# Altium PCB DL-14542-V01 20261004.PcbDoc
Units mm, origin at the board's own origin, x right, y up, seen from the top; angles counter-clockwise.
Board outline 144.6 x 41.83 mm, 2 copper layers (TopLayer, BottomLayer); 111 components, 38 nets, 286 pads, 151 vias.
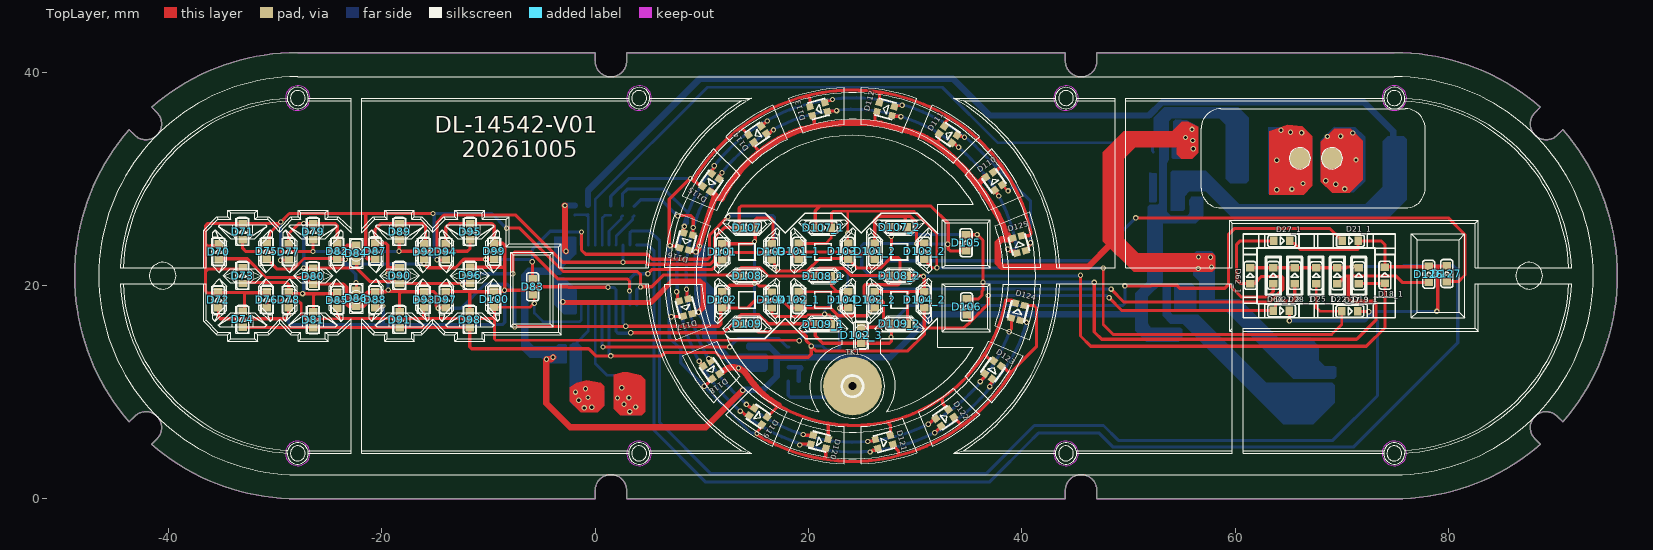
[diagram p0: TopLayer view]
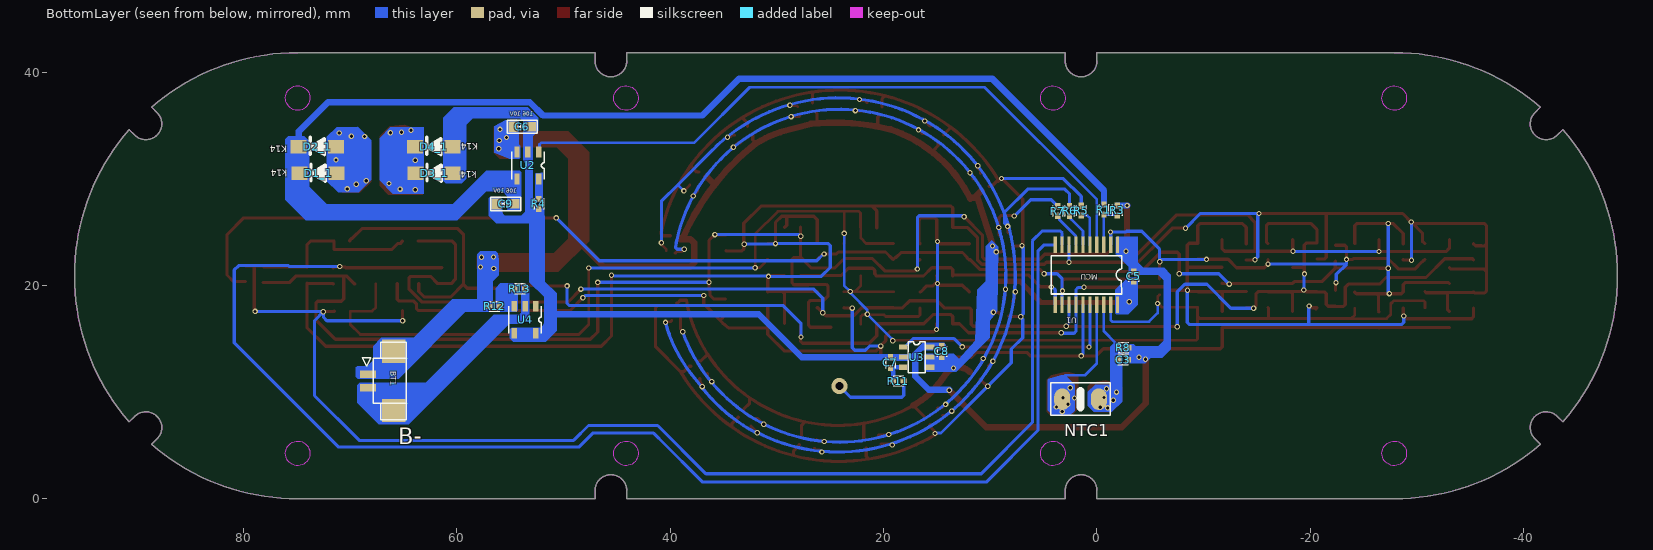
[diagram p1: BottomLayer view, seen from below]

## Layer stack, top to bottom
TopSolder: solder mask 0.0102, Solder Resist, Dk 3.5
TopLayer: signal copper 0.0356
Dielectric1: dielectric 0.32, FR-4, Dk 4.8
BottomLayer: signal copper 0.0356
BottomSolder: solder mask 0.0102, Solder Resist, Dk 3.5

## Board outline
-41.57,5.115 ccw(c-27.866,20.916) -27.866,0 0,0 0,0.791 cw(c1.482,0.791) 1.338,2.266 1.626,2.266 cw(c1.482,0.791) 2.964,0.791 2.964,0 44.071,0 44.071,0.791 cw(c45.553,0.791) 45.409,2.266 45.698,2.266 cw(c45.553,0.791) 47.036,0.791 47.036,0 74.901,0 ccw(c74.901,20.916) 88.606,5.115 88.084,5.637 cw(c89.132,6.685) 87.977,7.614 88.203,7.84 cw(c89.132,6.685) 90.18,7.733 90.702,7.211 ccw(c74.901,20.916) 90.702,34.62 90.18,34.098 cw(c89.132,35.146) 89.132,33.664 cw(c89.132,35.146) 88.203,33.991 87.986,34.206 87.977,34.217 cw(c89.132,35.146) 88.084,36.194 88.606,36.716 ccw(c74.901,20.916) 74.901,41.831 47.036,41.831 47.036,41.041 cw(c45.553,41.041) 45.698,39.566 45.553,39.559 45.409,39.566 cw(c45.553,41.041) 44.071,41.041 44.071,41.831 2.964,41.831 2.964,41.041 cw(c1.482,41.041) 1.626,39.566 1.482,39.559 1.338,39.566 cw(c1.482,41.041) 0,41.041 0,41.831 -27.866,41.831 ccw(c-27.866,20.916) -41.57,36.716 -41.048,36.194 cw(c-42.096,35.146) -40.955,34.201 -41.151,34.005 cw(c-42.096,35.146) -42.096,33.664 cw(c-42.096,35.146) -43.144,34.098 -43.666,34.62 ccw(c-27.866,20.916) -43.666,7.211 -43.144,7.733 cw(c-42.096,6.685) -41.151,7.827 -40.955,7.63 cw(c-42.096,6.685) -41.048,5.637

## Design rules (kind name [scope] priority, off if disabled: settings)
Clearance Clearance_1 [(InPoly)] p1: gap=0.254 ignorepadtopadclearanceinfootprint=FALSE except(0: Arc-Hole Track-Hole SMDPad-Hole THPad-Hole Via-Hole Fill-Hole Poly-Hole Region-Hole Text-Hole)
Clearance [All] p2: gap=0.178 ignorepadtopadclearanceinfootprint=FALSE except(0: Arc-Hole Track-Hole SMDPad-Hole THPad-Hole Via-Hole Fill-Hole Poly-Hole Region-Hole Text-Hole)
FabricationTestPointUsage TestPointUsage [All] p1: valid=0 allowmultiple=FALSE
FabricationTestpoint Testpoint [All] p1: side=3 testpointundercomponent=TRUE minsize=1.016 maxsize=2.54 preferedsize=1.524 minholesize=0.508 maxholesize=1.016 preferedholesize=0.813 testpointgrid=0.025 allowsidetop=TRUE allowsidebottom=TRUE usegrid=TRUE gridtolerance=0
PolygonConnect [All] p1: connectstyle=Relief reliefconductorwidth=0.254 reliefentries=4 polygonreliefangle="90 Angle" airgapwidth=0.254
RoutingVias [All] p1: holewidth=0.711 width=1.27 viastyle="Through Hole" minholewidth=0.711 minwidth=1.27 maxholewidth=0.711 maxwidth=1.27
SolderMaskExpansion [All] p1: expansion=0.102 istentingtop=FALSE
Width [All] p1: maxlimit=2.54 minlimit=0.152 preferedwidth=0.508
28 further rules are at their usual default settings.

## Components (designator, comment, footprint, x,y, rotation, side; value= is the part's Value field where it differs from the comment)
BT1 "1.25MM/2P卧贴" 1.25立贴2P 67.813,11.059 r270 bottom locked
C3 "10NF" SMD0402#1 -2.457,13.03 r180 bottom
C5 "100NF" SMD0402#1 -3.46,20.859 r90 bottom
C6 "106 10V" 0603CX 53.012,34.874 r180 bottom
C7 "15PF" SMD0402#2 19.355,12.268 r90 bottom
C8 "100NF" SMD0402#2 14.529,14.326 r270 bottom
C9 "106 10V" 0603CX 54.568,27.644 r180 bottom
D1_1 "k14" SOD123A 73.002,30.523 r0 bottom locked
D2_1 "K14" SOD123A 73.078,33.012 r0 bottom locked
D3_1 "k14" SOD123A 62.13,30.523 r0 bottom locked
D4_1 "K14" SOD123A 62.156,33.012 r0 bottom locked
D18_1 "3A" LED-1 74.029,20.955 r90 top locked
D19_1 "3A" LED-1 71.565,20.904 r90 top locked
D21_1 "3B" LED-1 70.778,24.18 r0 top locked
D22_1 "3B" LED-1 69.558,20.904 r90 top locked
D25_1 "3C" LED-1 67.577,20.904 r90 top locked
D27_1 "3D" LED-1 64.351,24.18 r0 top locked
D27_2 "3D" LED-1 64.33,17.644 r0 top locked
D27_3 "3D" LED-1 70.73,17.593 r0 top locked
D28_1 "3D" LED-1 65.571,20.929 r90 top locked
D60_1 "3E" LED-1 63.564,20.929 r90 top locked
D62_1 "3F" LED-1 61.405,20.929 r90 top locked
D70 "1E" LED-1 -35.286,23.171 r90 top locked
D71 "1E" LED-1 -33.034,25.052 r90 top locked
D72 "1E" LED-1 -35.295,18.651 r90 top locked
D73 "1E" LED-1 -33.034,20.937 r90 top locked
D74 "1E" LED-1 -33.026,16.821 r90 top locked
D75 "1E" LED-1 -30.748,23.198 r90 top locked
D76 "1E" LED-1 -30.748,18.677 r90 top locked
D77 "1E" LED-1 -28.716,23.173 r90 top locked
D78 "1E" LED-1 -28.716,18.651 r90 top locked
D79 "1E" LED-1 -26.43,25.052 r90 top locked
D80 "1E" LED-1 -26.43,20.887 r90 top locked
D81 "1E" LED-1 -26.43,16.797 r90 top locked
D82 "1E" LED-1 -24.17,23.198 r90 top locked
D83 "1E" LED-1 -5.856,19.871 r90 top locked
D84 "1E" LED-1 -22.366,23.02 r90 top locked
D85 "1E" LED-1 -24.17,18.626 r90 top locked
D86 "1E" LED-1 -22.366,18.804 r90 top locked
D87 "1E" LED-1 -20.614,23.223 r90 top locked
D88 "1E" LED-1 -20.614,18.651 r90 top locked
D89 "1E" LED-1 -18.328,25.052 r90 top locked
D90 "1E" LED-1 -18.328,20.937 r90 top locked
D91 "1E" LED-1 -18.315,16.804 r90 top locked
D92 "1E" LED-1 -16.029,23.179 r90 top locked
D93 "1E" LED-1 -16.029,18.683 r90 top locked
D94 "1E" LED-1 -13.997,23.154 r90 top locked
D95 "1E" LED-1 -11.715,25.05 r90 top locked
D96 "1E" LED-1 -11.715,20.961 r90 top locked
D97 "1E" LED-1 -13.997,18.683 r90 top locked
D98 "1E" LED-1 -11.737,16.804 r90 top locked
D99 "1E" LED-1 -9.451,23.205 r90 top locked
D100 "1E" LED-1 -9.429,18.7 r90 top locked
D101 "1E" LED-1 11.932,23.17 r90 top locked
D101_1 "1E" LED-1 19.07,23.196 r90 top locked
D101_2 "1E" LED-1 26.207,23.196 r90 top locked
D102 "1E" LED-1 11.932,18.649 r90 top locked
D102_1 "1E" LED-1 19.07,18.675 r90 top locked
D102_2 "1E" LED-1 26.207,18.675 r90 top locked
D102_3 "1E" LED-1 24.935,15.342 r90 top locked
D103 "1E" LED-1 16.578,23.163 r90 top locked
D103_1 "1E" LED-1 23.716,23.189 r90 top locked
D103_2 "1E" LED-1 30.853,23.189 r90 top locked
D104 "1E" LED-1 16.578,18.642 r90 top locked
D104_1 "1E" LED-1 23.716,18.668 r90 top locked
D104_2 "1E" LED-1 30.853,18.668 r90 top locked
D105 "1E" LED-1 34.765,24.002 r90 top locked
D106 "1E" LED-1 34.818,17.989 r90 top locked
D107 "1E" LED-1 14.269,25.428 r0 top locked
D107_1 "1E" LED-1 21.381,25.402 r0 top locked
D107_2 "1E" LED-1 28.519,25.453 r0 top locked
D108 "1E" LED-1 14.269,20.91 r0 top locked
D108_1 "1E" LED-1 21.381,20.884 r0 top locked
D108_2 "1E" LED-1 28.519,20.935 r0 top locked
D109 "1E" LED-1 14.269,16.411 r0 top locked
D109_1 "1E" LED-1 21.381,16.385 r0 top locked
D109_2 "1E" LED-1 28.519,16.436 r0 top locked
D110 "1615RGB" 1615RGB 37.39,29.788 r305 top locked
D111 "1615RGB" 1615RGB 33.091,34.143 r325 top locked
D112 "1615RGB" 1615RGB 27.238,36.534 r345 top locked
D113 "1615RGB" 1615RGB 20.955,36.533 r15 top locked
D114 "1615RGB" 1615RGB 15.221,34.176 r35 top locked
D115 "1615RGB" 1615RGB 10.853,29.65 r55 top locked
D116 "1615RGB" 1615RGB 8.525,24.125 r75 top locked
D117 "1615RGB" 1615RGB 8.501,17.944 r105 top locked
D118 "1615RGB" 1615RGB 10.909,12.082 r125 top locked
D119 "1615RGB" 1615RGB 15.283,7.74 r145 top locked
D120 "1615RGB" 1615RGB 21.036,5.362 r165 top locked
D121 "1615RGB" 1615RGB 27.091,5.337 r195 top locked
D122 "1615RGB" 1615RGB 32.774,7.593 r215 top locked
D123 "1615RGB" 1615RGB 37.294,12.094 r235 top locked
D124 "1615RGB" 1615RGB 39.622,17.543 r255 top locked
D125 "1615RGB" 1615RGB 39.748,23.851 r285 top locked
D126 "1E" LED-1 78.131,21.042 r90 top locked
D127 "1E" LED-1 79.827,21.113 r90 top locked
NTC1 "100K" "2P PAD-T" 0.127,9.347 r0 bottom
R1 "1K" SMD0402#1 -0.66,27.102 r270 bottom
R3 "2K" SMD0402#1 -1.905,27.051 r270 bottom
R4 "4K7" SMD0402#1 52.299,27.661 r90 bottom
R5 "22R" SMD0402#1 1.473,27.026 r270 bottom
R6 "22R" SMD0402#1 2.565,27 r270 bottom
R7 "22R" SMD0402#1 3.658,26.975 r270 bottom
R8 "100K" SMD0402#1 -2.483,14.173 r180 bottom
R11 "1K" SMD0402#2 18.101,11.049 r0 bottom
R12 "1K" SMD0402#3 56.946,18.027 r180 bottom
R13 "104P" SMD0402#3 53.595,19.717 r0 bottom
TK1 "CHUMO" PAD1 24.124,10.572 r0 top locked
U1 "MCU" TSSOP-20 -1.936,23.806 r0 bottom locked
U2 "TP4054" SOT23-5B 52.318,32.518 r270 bottom
U3 "PT2041" SOT-23-6A 18.154,14.244 r90 bottom
U4 "RY2201" SOT23-5B 52.578,18.059 r270 bottom locked

## Footprints (in the part's own frame and the unit in brackets; to place one, negate y for a bottom-side part, rotate by r counter-clockwise, add the part's x,y. Pads: shape width x height; smd on the part's side, far side on the other; paste and mask are expansions set on the pad)
1.25立贴2P [mm]
  rect 2.2x2.2 smd: 0(-2.8,1.906) 0(2.773,1.906)
  rect 0.7x1.524 smd: 1(-0.618,-0.5) 2(0.632,-0.5)
  silkscreen extent -3.62,-1.05 3.63,3.1
"2P PAD-T" [mil]
  oval 59.06x80 smd: 1(-12,0) 2(123,0)
  silkscreen extent -55,-60 165,60
0603CX [mm]
  rect 0.9x0.9 smd: 1(0,0)
  rect 0.9x1 smd: 2(-1.7,0)
  silkscreen extent -2.25,-0.63 0.55,0.62
1615RGB [mm]
  rect 0.65x0.65 smd: 1(-0.725,0.43) 2(0.725,0.43) 3(0.725,-0.43) 4(-0.725,-0.43)
  silkscreen extent -0.81,-0.8 0.79,0.8
LED-1 [mm]
  rect 0.7x0.8 smd: 1(-0.75,0) 2(0.75,0)
  silkscreen extent -1.3,-0.56 1.32,0.56
PAD1 [mm]
  round 5.5 smd: 1(0.01,0)
  silkscreen extent -1,-1 1,1
SMD0402#1 [mm]
  rect 0.6x0.5 smd: 1(-0.45,0) 2(0.45,0)
  silkscreen extent -0.5,-0.46 0.5,0.46
SMD0402#2 [mm]
  rect 0.6x0.5 smd: 1(0,0) 2(1,0)
  silkscreen extent 0,-0.46 1,0.46
SMD0402#3 [mm]
  rect 0.6x0.5 smd: 1(-0.011,0.007) 2(0.99,0.007)
  silkscreen extent -0.01,-0.45 0.99,0.47
SOD123A [mm]
  rect 1.5x1.25 smd: 1(-1.75,0) 2(1.75,0)
  silkscreen extent -0.67,-0.87 0.65,0.75
SOT23-5B [mil]
  rect 40x20 smd: 1(0,0) 2(0,-40) 3(0,-80) 4(100,-80) 5(100,0)
  silkscreen extent 0,-100 100,20
SOT-23-6A [mm]
  rect 0.5x0.8 smd: 1(0,0) 2(-0.95,0) 3(-1.9,0) 4(-1.9,-2.507) 5(-0.95,-2.507) 6(0,-2.507)
  silkscreen extent -2.4,-2.05 0.5,-0.45
TSSOP-20 [mm]
  rect 0.3x1.55 smd: 1(0,0) 2(0.65,0) 3(1.3,0) 4(1.95,0) 5(2.6,0) 6(3.25,0) 7(3.9,0) 8(4.55,0) 9(5.2,0) 10(5.85,0) 11(5.85,5.6) 12(5.2,5.6) 13(4.55,5.6) 14(3.9,5.6) 15(3.25,5.6) 16(2.6,5.6) 17(1.95,5.6) 18(1.3,5.6) 19(0.65,5.6) 20(0,5.6)
  silkscreen extent -0.37,1 6.23,4.6

## Free pads (board coordinates)
  round 1.524 hole 0.762: 3(24.134,10.572)
  round 2 smd: 8(66.051,31.916) 8(69.051,31.916)

## Via types
v1: diameter 0.5, hole 0.3, TopLayer to BottomLayer, 151 vias

## Nets (pads, with @x,y where several pads share a name; then routed paths per layer and width w, separated by ;. In a path a pad name is that pad's centre, name@x,y a point inside that pad or via, vN(x,y) a via of type N, cw(c..) or ccw(c..) an arc to the next point about the centre after c; other vN are vias at no path point)
5V: C9.1 D1_1.2 D2_1.2 R1.1 U2.4 | length 114.8
  BottomLayer w0.6: R1.1 -0.66,28.905 9.83,39.395 33.528,39.395 36.992,35.932 51.918,35.932 53.167,37.181 72.065,37.181 74.79,34.456 74.79,33.012 74.79,30.561 D1_1.2 74.752,28.727 73.05,27.026 60.046,27.026 57.093,29.978 54.396,29.978 54.396,29.921 U2.4@54.35,29.967 ; U2.4 U2.4@54.35,29.967 ; C9.1 54.418,27.794 54.418,28.109 54.381,28.145 54.381,29.421 54.35,29.452 U2.4@54.35,29.967
B5: R12.2 R13.2 U4.3 | length 3
  BottomLayer w0.4: R13.2 54.597,19.698 54.597,18.072 U4.3 54.623,18.047 55.944,18.047 R12.2
B+: BT1.0@65.907,13.859 BT1.1 C5.1 C6.2 C8.2 D110.4 D111.4 D112.4 D113.4 D114.4 D115.4 D116.4 D117.4 D118.4 D119.4 D120.4 D121.4 D122.4 D123.4 D124.4 D125.4 R12.1 U1.20 U2.3 U3.4 U3.5 | length 190.4
  TopLayer w0.3: D116.4 8.825,23.241 9.009,23.154 v1(9.433,23.154) ; D117.4 9.211,17.462 9.665,17.462 v1(9.703,17.501) ; D115.4 11.243,28.356 11.282,28.317 11.283,28.316 11.361,28.238 ; D118.4 11.825,11.829 11.922,11.897 ccw(c11.712,12.111) D118.4@11.925,11.9 ; D114.4 14.873,33.123 15.313,32.683 15.313,32.403 ; D119.4 17.202,8.755 ccw(c24.207,21.02) 21.848,7.094 ; 19.481,34.716 cw(c24.605,19.758) 20.641,35.065 20.534,35.172 20.534,35.763 D113.4 ; D120.4 21.848,7.094 ; 26.347,35.257 26.241,35.365 26.241,36.121 D112.4 ; 26.365,35.238 26.368,35.234 ; D121.4 27.68,6.9 27.357,7.222 ; 31.939,33.329 32.25,33.64 D111.4 ; D122.4 33.121,8.385 32.549,8.957 32.549,9.48 ; D123.4 37.107,12.934 36.484,13.557 ; D124.4 39.314,18.354 39.05,18.618 38.479,18.618 cw(c24.734,21.111) 36.484,13.557 ; 21.848,7.094 ccw(c24.273,21.408) 27.357,7.222 ; 27.357,7.222 ccw(c24.273,21.408) 32.549,9.48 ; 32.549,9.48 ccw(c24.273,21.408) 36.484,13.557
  TopLayer w0.4: v1(55.337,33.872) 49.824,33.872 48.793,32.842 48.793,23.825 49.948,22.671 v1(56.557,22.671)
  TopLayer w0.5: v1@-3.085,18.415 5.232,18.415 7.214,20.396 9.842,20.396 10.135,20.103 10.135,17.932 v1(9.703,17.501)
  TopLayer w0.6: v1@9.514,23.221 9.616,23.323 9.66,23.461 ; v1@9.745,23.721 11.204,28.238 11.361,28.238 ; D115.4 10.898,28.809 11.47,28.238 11.774,28.238 11.88,28.132 cw(c23.115,22.665) 15.227,32.355 ; D118.4@11.925,11.9 cw(c12.969,10.856) 14.222,11.636 ccw(c21.667,16.304) 15.453,10.091 ccw(c21.307,15.943) 17.202,8.755 ; 15.313,32.403 cw(c23.575,22.253) 19.333,34.634 ; 19.252,34.589 cw(c24.583,14.006) 26.768,35.155 26.813,35.144 cw(c26.659,34.563) 26.815,35.143 29.681,34.375 cw(c26.181,23.853) 29.699,34.369 cw(c26.181,23.853) 31.939,33.329 cw(c18.629,16.091) 35.204,30.219 cw(c17.553,15.174) 35.727,29.583 ; D110.4 36.514,30.136 35.962,29.583 35.727,29.583 ; D125.4@38.806,24.459 ccw(c17.553,15.174) 35.727,29.583 ; D125.4 39.047,24.342 38.096,24.342 37.744,23.99 37.744,22.119 38.096,21.768 46.228,21.768 48.362,23.901
  BottomLayer w0.4: -3.46,20.015 -3.46,18.852 -2.813,18.205 U1.20 ; v1(9.433,23.154) 9.433,23.126 9.703,22.857 v1(9.703,17.501) 9.703,17.474 9.753,17.424 9.753,17.395 10.389,16.76 10.389,15.089 13.005,12.473 13.205,12.473 13.41,12.268 v1(13.437,12.268) 13.456,12.287 13.456,13.069 13.712,13.325 C8.2 14.544,13.31 15.631,13.31 U3.5 U3.4 ; U2.3 54.35,32.772 54.635,33.057 C6.2@54.635,34.389 ; v1@56.566,22.733 56.956,22.342 R12.1 59.004,18.034 63.179,13.859 65.907,13.859 65.837,13.789 65.837,12.065 66.218,11.684 68.306,11.684 BT1.1
  other v1: -3.033,18.47 56.533,21.601 57.776,21.731 57.674,22.646 9.785,23.708 56.058,32.815 56.023,33.593 55.947,34.634
B-: BT1.0@65.907,8.286 BT1.2 R13.1 U4.2 | length 22.7
  BottomLayer w0.4: R13.1 53.589,19.706 53.589,18.064 U4.2 53.648,18.005 53.648,17.122 54.057,16.713 55.321,16.713 63.748,8.286 65.907,8.286 66.377,8.756 66.377,10.192 66.612,10.427 68.237,10.427 68.275,10.389 BT1.2
BAT_ADC: 
BLED: R7.2 U1.7 | length 3.4
  BottomLayer w0.254: U1.7 1.987,23.829 1.987,24.644 3.535,26.191 3.535,26.402 R7.2
C: 
CX1: D3_1.2 D4_1.2 pad.8@66.051,31.916 | length 4.7
  TopLayer w0.4: v1(63.89,31.746) 63.917,31.746 64.087,31.916 pad.8@66.051,31.916
  BottomLayer w0.4: D3_1.2 63.906,30.548 D4_1.2
  other v1: 63.881,28.981 65.303,29.032 66.345,29.566 66.218,34.315 65.176,34.366 64.287,34.544
CX2: D1_1.1 D2_1.1 pad.8@69.051,31.916 | length 6.8
  TopLayer w0.4: pad.8@69.051,31.916 71.14,31.916 71.285,31.772 v1(71.312,31.772)
  BottomLayer w0.4: D1_1.1 71.328,30.599 71.328,31.772 D2_1.1
  BottomLayer w0.508: v1(70.256,29.058) 70.663,29.464 70.663,30.059 71.127,30.523 D1_1.1
  other v1: 69.418,29.489 68.478,29.82 68.631,33.96 69.875,33.98 71.018,34.29
FULL: U1.4 U2.1 | length 63.8
  BottomLayer w0.254: U1.4 0.014,28.056 10.541,38.583 32.537,38.583 37.744,33.376 52.086,33.376 52.235,33.227 52.235,32.601 U2.1
GLED: R6.2 U1.6 | length 3.3
  BottomLayer w0.254: U1.6 1.314,25.114 1.956,25.756 2.442,26.242 2.442,26.427 R6.2
GND: C3.2 C5.2 C6.1 C7.2 C8.1 C9.2 D3_1.1 D4_1.1 R3.1 R4.1 R8.2 U1.1 U2.2 U3.2 U3.6 U4.4 U4.5 | length 136.4
  TopLayer w0.35: v1@-4.572,13.03 v1@-4.547,13.056
  TopLayer w0.6: v1@-4.572,13.03 -4.572,8.966 -2.311,6.706 10.365,6.706 v1(13.834,10.174) ; v1(-4.548,13.095) -4.126,13.095 v1(-3.937,13.284) ; v1(-2.827,27.501) -2.819,27.494 -2.819,23.297 v1(-2.727,23.204)
  BottomLayer w0.35: R8.2 -2.92,14.16 -2.92,13.601 ; C3.2 -2.92,13.042 -2.92,13.601 ; U1.1 -1.936,23.596 -1.961,23.571 -1.961,23.206 -3.107,23.206 -3.46,22.853 C5.2 -3.512,21.361 -5.84,21.361 -6.513,20.689 -6.513,14.274 -6.047,13.808 -4.501,13.808 -3.978,13.284 v1(-3.937,13.284) -3.896,13.284 -3.579,13.601 -2.92,13.601 ; C8.1 14.529,14.319 14.604,14.244 U3.6 ; U3.6@15.647,14.244 16.338,14.244 17.018,13.564 17.287,13.294 U3.2 18.167,13.281 19.342,13.281 C7.2 ; R4.1 53.061,27.211 ; 52.807,26.391 52.807,20.244 51.079,18.517 51.079,17.297 51.079,16.078 51.638,15.519 U4.5 U4.4 ; C6.1 53.238,34.647 53.238,33.056 53.255,33.039 53.255,32.597 U2.2 53.255,32.439 53.255,32.185 53.162,32.092 53.162,27.211 53.061,27.211 ; C6.1@53.338,34.572 53.342,34.575 53.342,35.788 53.723,36.17 59.436,36.17 60.406,35.2 D4_1.1 60.406,30.548 D3_1.1 ; C9.2 56.268,26.576 56.058,26.365 53.139,26.365 52.934,26.57 52.934,27.084 53.061,27.211
  BottomLayer w0.6: v1(-2.827,27.501) R3.1 ; v1@13.843,10.236 15.773,10.236 17.018,11.481 17.018,13.564 ; C7.2 27.67,13.268 31.699,17.297 51.079,17.297
GND_EN: NTC1.2 U1.17 | length 11.3
  BottomLayer w0.254: U1.17 0.014,12.711 1.143,11.582 2.972,11.582 3.251,11.303 NTC1.2
  other v1: 3.249,8.181 3.802,8.617 2.713,8.868 2.11,9.454 3.169,9.483 2.495,10.409
GRID2: 
K1: C7.1 R11.2 U3.3 | length 2.6
  BottomLayer w0.4: U3.3 19.305,12.344 19.355,12.294 C7.1 19.355,12.218 19.101,11.964 R11.2
K2: U1.16 U3.1 | length 22.1
  TopLayer w0.28: v1(0.736,14.241) 0.74,14.245 12.62,14.245 v1(12.624,14.249)
  BottomLayer w0.28: U1.16 0.663,18.204 0.663,14.374 0.736,14.301 v1(0.736,14.241) ; v1(12.624,14.249) 13.427,15.053 17.195,15.053 18.004,14.244 U3.1
NetD49_2: D110.2 D111.2 D112.2 D113.2 D114.2 D115.2 D116.2 D117.2 D118.2 D119.2 D120.2 D121.2 D122.2 D123.2 D124.2 D125.2 R6.1 | length 120.7
  TopLayer w0.254: D113.2 21.721,37.314 v1@22.073,37.314 ; D112.2 28.132,36.845 28.732,36.845 v1(28.779,36.892) ; D111.2 34.23,34.08 34.368,33.942 ; D110.2 38.158,29.429 38.71,28.877 v1(38.71,28.865) ; D124.2 39.987,16.594 40.39,16.594 v1(40.437,16.546) ; D125.2 40.351,23.355 v1@40.772,23.776
  TopLayer w0.3: v1(7.646,19.417) 7.646,19.363 7.73,19.278 7.73,18.7 D117.2 ; D116.2 8.333,24.972 8.333,25.504 v1(8.369,25.54) ; v1(9.754,12.903) 9.754,12.86 10.141,12.473 D118.2 ; D115.2 10.917,30.775 v1@11.138,30.997 ; v1(13.614,8.23) 13.653,8.191 13.77,8.191 14.157,7.804 D119.2 ; D114.2 15.611,34.944 16.086,35.419 v1(16.13,35.419) ; v1(19.177,5.055) 19.231,5.055 19.311,5.134 D120.2 ; v1(25.781,4.394) 25.835,4.394 26.007,4.567 26.334,4.567 D121.2 ; v1(31.827,6.209) 31.827,6.217 32.427,6.817 D122.2 ; v1(36.983,10.527) 37.021,10.565 37.021,10.759 37.23,10.968 D123.2
  BottomLayer w0.254: v1(38.71,28.865) 39.261,29.416 39.261,29.456
  BottomLayer w0.3: R6.1 2.565,28.575 3.023,29.032 6.502,29.032 8.661,26.873 8.661,26.704 8.661,25.832 v1(8.369,25.54) ; v1(31.827,6.209) v1@31.891,6.256 ; v1(40.437,16.546) cw(c27.714,19.905) 38.086,11.806 37.047,10.476 v1(36.983,10.527) 37.044,10.472 cw(c24.515,20.26) 32.012,6.239 cw(c31.992,6.539) v1@31.891,6.256 ; v1(40.819,24.005) 40.819,27.898 39.261,29.456 35.988,32.729 ccw(c24.248,20.992) v1@31.891,6.256
  other v1: 11.177,31.228 34.621,33.895 22.251,37.425
NetD49_3: D110.3 D111.3 D112.3 D113.3 D114.3 D115.3 D116.3 D117.3 D118.3 D119.3 D120.3 D121.3 D122.3 D123.3 D124.3 D125.3 R7.1 | length 112.2
  TopLayer w0.254: v1(38.823,15.675) 38.823,15.742 39.019,15.937 D124.3
  TopLayer w0.3: v1@7.66,26.554 7.669,26.545 7.924,26.545 7.947,26.568 8.941,26.568 9.204,26.305 v1(9.204,25.442) 9.166,25.405 9.166,24.752 D116.3 ; v1(8.569,19.651) 8.607,19.613 8.607,18.877 D117.3 ; v1(10.655,13.154) 10.655,13.113 D118.3 ; D115.3 11.621,30.244 11.896,30.519 v1(11.896,30.573) ; v1(14.182,8.856) 14.237,8.856 14.508,8.584 14.575,8.584 14.651,8.508 D119.3 ; D114.3 16.321,34.239 16.668,34.586 v1(16.722,34.586) ; v1(19.516,6.037) 19.571,6.037 19.643,5.965 D120.3 ; D113.3 21.813,36.352 22.602,36.352 v1(22.641,36.39) ; v1(25.562,5.376) 25.6,5.415 26.129,5.415 D121.3 ; D112.3 27.889,35.869 28.622,35.869 v1(28.66,35.831) ; v1(31.226,7.002) 31.28,7.002 31.808,7.53 D122.3 ; D111.3 33.602,33.375 34.017,32.961 v1(34.071,32.961) ; v1(36.103,10.99) 36.103,11.044 36.526,11.467 D123.3 ; D110.3 37.454,28.819 37.83,28.443 v1(37.83,28.389) ; v1(38.668,23.403) 38.722,23.403 38.919,23.207 39.353,23.207 D125.3
  BottomLayer w0.3: R7.1 4.274,28.042 6.21,28.042 v1(7.744,26.507) ; v1(38.668,23.403) 39.329,23.403 39.505,23.579 ccw(c24.134,20.916) v1@38.839,15.709
NetR2_1: 
NetR4_1: R4.2 U2.5 | length 1.9
  BottomLayer w0.4: R4.2 52.309,28.121 52.309,29.968 U2.5
NetR5_1: D110.1 D111.1 D112.1 D113.1 D114.1 D115.1 D116.1 D117.1 D118.1 D119.1 D120.1 D121.1 D122.1 D123.1 D124.1 D125.1 R5.1 | length 131.4
  TopLayer w0.3: v1(7.137,17.069) 7.169,17.101 8.241,17.101 D117.1 ; D116.1 7.755,23.704 6.959,23.704 6.959,28.092 8.89,30.023 8.995,30.023 9.25,29.768 9.381,29.768 9.469,29.68 9.846,29.303 D115.1 ; 9.194,29.812 cw(c24.043,21.038) 13.722,34.857 ; v1@10.246,10.434 10.246,10.515 D118.1 ; D114.1 13.722,34.77 13.722,34.857 ; D119.1 15.63,6.74 15.162,6.272 15.162,6.008 ccw(c24.134,20.916) 21.371,3.737 ; D113.1 20.144,37.491 19.853,37.781 ; D120.1 21.625,3.991 21.371,3.737 ; D112.1 26.649,37.948 26.81,38.109 ; D121.1 27.902,5.029 28.431,4.5 28.431,4.055 ; D111.1 32.743,35.196 33.163,35.616 33.163,35.79 ; D122.1 34.213,7.059 34.213,6.732 ; D110.1@37.501,30.684 D110.1 37.49,30.629 38.084,31.223 ; D123.1 38.203,12.441 38.717,11.927 39.032,11.927 ; D125.1 40.652,24.662 40.74,24.75 40.828,24.838 40.828,24.962 40.828,24.994 ccw(c24.501,21.521) 38.084,31.223 ; D124.1 41.127,18.132 41.277,17.982 41.365,17.894 41.365,14.259 39.032,11.927 ; 13.722,34.857 cw(c24.134,20.916) 19.853,37.781 ; 19.853,37.781 cw(c24.134,20.916) 26.81,38.109 ; 21.371,3.737 ccw(c24.134,20.916) 28.431,4.055 ; 26.81,38.109 cw(c24.134,20.916) 33.163,35.79 ; 28.431,4.055 ccw(c24.134,20.916) 34.213,6.732 ; 33.163,35.79 cw(c24.501,21.521) 38.084,31.223 ; 34.213,6.732 ccw(c24.134,20.916) 39.032,11.927
  BottomLayer w0.3: R5.1 1.473,28.346 3.15,30.023 v1(8.941,30.023) ; v1(7.027,23.738) 7.027,23.684 6.909,23.566 6.909,17.352 v1@7.137,17.123 ; v1(7.137,17.069) 7.137,17.015 6.96,16.837 6.96,15.113 8.026,14.046 8.026,12.765 v1(10.24,10.551) 14.617,6.174 15.142,6.174 v1(15.18,6.136)
NetTK1_1: pad.3 R11.1 TK1.1 | length 7.9
  BottomLayer w0.3: R11.1 18.101,9.71 18.276,9.535 23.097,9.535 pad.3
NTC_ADC: C3.1 NTC1.1 R8.1 U1.18 | length 11.3
  BottomLayer w0.254: R8.1 -2.033,13.919 ; U1.18 -0.636,15.722 -1.727,14.63 -1.727,14.225 -2.033,13.919 ; NTC1.1 -1.651,9.347 -2.033,9.729 -2.033,13.919
  other v1: -1.007,8.533 -0.32,8.583 -1.526,9.253 -0.666,9.508 -1.828,10.007 -0.895,10.321
P_5V: R1.2 R3.2 U1.3 | length 4.1
  BottomLayer w0.254: R3.2 -1.905,26.626 -0.686,26.626 R1.2 ; R1.2@-0.757,26.55 -0.707,26.55 -0.636,26.479 U1.3
RLED: R5.2 U1.5 | length 3.4
  BottomLayer w0.254: U1.5 0.664,26.318 0.922,26.576 R5.2
SEG1: D18_1.1 D19_1.1 D71.1 D79.1 D89.1 D95.1 D101_2.2 D102_2.2 D103_2.2 D104_2.2 D105.1 D107.1 D107_1.1 D107_2.2 D108_2.2 D109_2.2 U1.8 | length 185.8
  TopLayer w0.3: D71.1 -33.034,23.484 -32.741,23.19 v1(-26.441,23.19) -26.436,23.196 -26.436,24.296 D79.1 ; D89.1 -18.352,24.277 -18.352,23.228 v1(-18.377,23.203) -14.808,23.203 ; D95.1 -11.715,23.464 -11.976,23.203 -14.808,23.203 ; D107_1.1 20.631,26.992 21.091,27.452 ; D102_2.2 29.464,19.425 ; D101_2.2 26.207,26.156 26.545,26.495 29.069,26.495 ; D109_2.2 29.269,19.229 29.464,19.425 ; D108_2.2 30.649,20.935 30.731,20.853 v1(30.785,20.853) 30.785,20.799 30.853,20.731 D104_2.2@30.853,19.425 ; D107_2.2 29.069,25.653 29.069,26.495 ; D104_2.2 D104_2.2@30.853,19.425 ; D103_2.2 30.847,23.933 30.13,23.933 v1(30.124,23.927) 30.124,25.919 29.548,26.495 29.069,26.495 ; D105.1 34.754,23.241 33.272,23.241 33.096,23.417 33.096,25.832 31.476,27.452 21.091,27.452 ; v1(45.491,20.969) 45.491,15.265 46.457,14.3 72.288,14.3 74.029,16.041 D18_1.1 74.003,20.179 71.59,20.179 D19_1.1 ; -14.808,23.203 -14.808,25.933 -14.122,26.619 -7.468,26.619 -3.02,22.172 4.733,22.172 4.913,21.992 10.778,21.992 11.201,22.415 11.201,24.511 12.118,25.428 D107.1 13.519,27.276 13.695,27.452 21.091,27.452 ; 29.464,19.425 D104_2.2@30.853,19.425
  BottomLayer w0.3: v1(-26.441,23.19) -26.435,23.197 -18.383,23.197 v1(-18.377,23.203) ; v1(2.614,22.172) U1.8 ; v1(33.054,23.872) 33.027,23.9 30.152,23.9 v1(30.124,23.927) 25.169,23.927 24.994,23.751 24.994,21.692 25.832,20.853 v1(30.785,20.853) 30.823,20.891 45.272,20.891 45.312,20.931 45.453,20.931 v1(45.491,20.969)
SEG2: D22_1.1 D75.1 D82.1 D83.2 D84.2 D86.2 D92.1 D99.1 D102_3.2 D103.1 D103_1.1 D105.2 D106.2 D107_2.1 D126.1 U1.2 | length 175.3
  TopLayer w0.3: D75.1 -30.658,22.358 -30.64,22.358 -30.531,22.248 -30.498,22.248 -29.789,21.539 -28.27,21.539 -27.28,22.53 -24.038,22.53 -23.957,22.449 v1(-23.393,22.45) v1(-23.393,22.45) -23.393,23.594 -23.218,23.77 D84.2 ; D86.2 v1@-22.366,20.283 ; D92.1@-16.029,22.429 v1(-16.029,22.002) -15.692,21.666 -13.081,21.666 -12.293,22.455 D99.1 ; v1(-5.894,22.227) -5.856,22.188 D83.2 ; v1(-1.27,25.019) -1.27,23.315 -0.885,22.93 4.883,22.93 5.344,22.469 10.548,22.469 10.724,22.645 10.724,24.709 12.446,26.431 v1(12.446,26.441) ; D103.1 16.628,22.413 16.828,22.213 v1(16.828,21.54) 17.004,21.365 19.882,21.365 21.048,22.53 23.575,22.53 23.666,22.439 D103_1.1 23.766,22.439 24.564,21.641 26.772,21.641 27.769,22.638 ; D102_3.2 26.85,16.092 27.026,16.268 27.026,18.427 26.85,18.602 25.619,18.602 25.197,19.025 25.197,19.916 25.384,20.103 27.018,20.103 27.053,20.068 28.399,20.068 28.575,20.244 28.575,22.454 28.391,22.638 27.769,22.638 ; D107_2.1 27.769,22.638 ; D105.2 35.827,24.752 36.354,24.225 36.354,19.54 36.278,19.464 36.278,19.107 35.909,18.739 D106.2 ; v1(46.787,20.295) 46.787,15.646 47.473,14.961 71.374,14.961 73.203,16.789 73.203,18.341 73.027,18.517 70.815,18.517 70.587,18.745 70.587,20.904 ; D22_1.1 69.571,20.166 69.621,20.166 70.359,20.904 70.587,20.904 ; D126.1 75.643,20.292 75.032,20.904 70.587,20.904
  BottomLayer w0.3: v1(-23.393,22.45) -23.393,22.002 ; v1(-22.399,20.268) -22.437,20.307 -22.437,21.046 -23.393,22.002 ; v1(-16.029,22.002) -23.393,22.002 ; v1(-10.27,22.446) -6.114,22.446 v1(-5.894,22.227) -5.856,22.265 -5.856,23.43 -4.2,25.086 -2.796,25.086 -2.729,25.019 v1(-1.27,25.019) -1.286,25.003 U1.2 ; v1(12.446,26.441) 12.5,26.441 12.602,26.543 16.653,26.543 16.828,26.367 v1(16.828,21.54) ; v1(27.756,24.618) 27.81,24.618 27.982,24.79 35.788,24.79 v1(35.808,24.771) ; v1(36.354,20.314) 36.363,20.304 46.777,20.304 v1(46.787,20.295)
SEG3: D25_1.1 D27_3.1 D76.1 D83.1 D85.1 D93.1 D100.1 D101_1.2 D102_1.2 D103_1.2 D103_2.1 D104.1 D104_1.2 D107_1.2 D108_1.2 D109_1.2 U1.19 | length 168.6
  TopLayer w0.254: D76.1 -30.748,18.433 -30.599,18.582 -27.827,18.582 -27.534,18.288 -27.534,17.294 -27.132,16.892 -23.824,16.892 -23.817,16.899 ; D85.1 -24.17,17.252 -23.817,16.899 ; D93.1 -16.086,17.876 -16.086,17.048 -15.938,16.899 ; D83.1 -5.69,18.954 v1(-5.69,18.315) -5.756,18.315 -6.122,17.95 D100.1 -9.429,17.116 ; D104.1 16.578,17.243 16.727,17.094 19.787,17.094 19.939,17.247 21.982,17.247 22.131,17.098 D109_1.2 ; D102_1.2@19.07,19.421 22.688,19.421 ; D101_1.2 21.635,23.946 22.131,24.443 D107_1.2 22.161,25.431 22.161,26.801 22.309,26.949 23.673,26.949 23.774,26.949 ; v1(19.135,14.83) 19.106,14.859 -9.28,14.859 -9.429,15.008 -9.429,17.116 ; D108_1.2 22.131,19.988 22.688,19.431 v1(23.114,19.431) 23.121,19.424 23.709,19.424 D104_1.2 ; v1(23.69,24.885) 23.673,24.902 23.673,26.848 23.774,26.949 ; v1@23.703,24.872 23.69,24.859 23.69,23.964 D103_1.2 ; D103_2.1 30.903,22.439 31.126,22.216 31.126,22.166 31.632,21.66 v1(32.036,21.66) 32.029,21.666 32.029,24.824 29.904,26.949 23.774,26.949 ; v1(47.625,21.641) 47.625,16.358 48.567,15.415 69.035,15.415 69.98,16.361 D27_3.1 67.929,17.593 67.577,17.945 D25_1.1 ; -23.817,16.899 -15.938,16.899 ; -15.938,16.899 -9.646,16.899 -9.429,17.116
  BottomLayer w0.254: v1(-5.69,18.315) -5.69,17.424 -4.877,16.612 -1.435,16.612 -1.286,16.76 U1.19 ; v1(19.135,14.83) 19.135,14.896 19.258,15.019 19.258,15.044 v1(21.515,17.301) 21.518,17.304 21.518,17.683 23.067,19.232 23.067,19.384 23.69,20.007 v1(23.69,24.885) ; v1(32.036,21.66) 32.045,21.65 47.615,21.65 v1(47.625,21.641)
SEG4: D27_2.1 D28_1.1 D74.1 D81.1 D91.1 D98.1 D101.2 D102.2 D103.2 D104.2 D104_1.1 D104_2.1 D106.1 D107.2 D108.2 D109.2 U1.15 | length 153.1
  TopLayer w0.3: D74.1 -33.014,16.059 -26.442,16.059 D81.1 -26.427,16.05 -18.319,16.05 D91.1 D98.1 -11.737,14.248 -11.561,14.072 -0.61,14.072 0.058,13.404 v1(1.464,13.404) 6.251,13.404 6.579,13.732 11.312,13.732 11.43,13.614 11.76,13.284 19.995,13.284 20.259,13.548 20.259,14.374 19.796,14.837 19.796,15.256 19.382,15.67 15.296,15.67 15.091,15.875 v1(15.037,15.875) 15.028,15.884 15.028,16.402 D109.2 ; D102.2 11.982,19.399 12.607,20.024 14.723,20.024 14.882,20.182 v1(14.936,20.182) 14.974,20.22 14.974,20.865 D108.2 ; D101.2 14.68,23.921 14.888,24.128 v1(14.942,24.128) ; v1@14.932,24.138 14.932,24.173 15.019,24.26 D107.2 15.019,26.163 15.195,26.338 16.487,26.338 16.662,26.163 16.662,23.998 D103.2 ; v1@15.04,20.286 15.362,19.964 15.956,19.964 16.528,19.392 D104.2 ; v1@20.275,14.282 20.688,13.868 29.312,13.868 30.853,15.41 30.853,16.004 ; v1(22.936,17.882) 22.954,17.9 23.698,17.9 D104_1.1 ; D104_2.1 30.853,16.004 ; D106.1 34.868,17.239 35.068,17.039 35.068,16.991 35.244,16.815 35.408,16.815 ; v1(36.855,19.069) 36.855,18.263 36.305,17.713 35.408,16.815 ; v1(48.18,18.847) 49.383,17.644 D27_2.1 63.779,17.844 63.779,18.298 64.023,18.542 65.395,18.542 65.571,18.718 D28_1.1 ; 30.853,16.004 34.472,16.004 35.078,16.485 35.326,16.733 35.408,16.815
  BottomLayer w0.3: U1.15 1.314,13.608 1.464,13.458 v1(1.464,13.404) ; v1(14.942,24.128) 14.939,24.125 14.939,20.185 v1(14.936,20.182) 14.936,16.03 15.037,15.929 v1(15.037,15.875) ; v1(20.259,14.32) 21.314,14.32 21.711,13.923 22.712,13.923 22.936,14.148 v1(22.936,17.882) ; v1(36.855,19.069) 47.903,19.069 48.126,18.847 v1(48.18,18.847)
SEG5: D21_1.1 D60_1.1 D72.1 D78.1 D88.1 D94.2 D95.2 D96.2 D97.2 D98.2 D99.2 D100.2 D102_3.1 D109.1 D109_1.1 D109_2.1 U1.14 | length 161.2
  TopLayer w0.3: D72.1 -35.295,17.067 -35.119,16.891 -28.981,16.891 -28.716,17.156 D78.1 ; D88.1@-20.498,17.786 D88.1 -20.606,17.909 -20.168,17.909 ; D97.2 -11.737,19.434 D98.2 ; D94.2 -13.997,25.449 -13.646,25.8 D95.2 -9.646,25.8 -9.451,25.605 D99.2 -8.636,23.955 -8.461,23.779 -8.461,21.702 ; -11.737,19.406 -9.474,19.406 D100.2 -8.636,19.45 -8.461,19.626 -8.461,21.702 ; D96.2 -8.469,21.711 -8.461,21.702 ; v1(-8.483,19.547) -6.643,19.547 -6.302,19.888 -2.594,19.888 -2.543,19.837 v1(1.219,19.837) ; v1(3.353,15.57) 12.04,15.57 12.88,16.411 D109.1 13.519,17.103 13.695,17.278 15.365,17.278 16.232,16.412 20.631,16.412 D109_1.1 20.631,15.284 21.323,14.592 D102_3.1 27.593,14.592 27.769,14.768 D109_2.1 ; v1(49.657,19.964) 52.094,19.964 52.145,20.015 54.528,20.015 54.802,19.741 59.01,19.741 59.372,20.104 ; D60_1.1 63.564,19.434 63.053,18.923 60.554,18.923 59.372,20.104 ; D21_1.1 70.027,24.23 69.827,24.43 69.777,24.43 68.879,25.329 59.898,25.329 59.372,24.803 59.372,20.104
  BottomLayer w0.3: v1(-28.749,17.141) -28.749,16.533 -28.573,16.358 -19.845,16.358 ; v1(-19.885,18.08) -19.847,18.041 -19.847,17.9 -19.845,17.898 -19.845,16.358 ; v1@-8.534,19.533 -8.458,19.456 -8.458,16.533 -8.634,16.358 -19.845,16.358 ; v1(1.219,19.837) 1.257,19.799 1.788,19.799 1.964,19.623 U1.14 1.964,15.708 2.14,15.532 3.315,15.532 v1(3.353,15.57) ; v1(27.731,15.169) 27.731,16.43 29.437,18.136 49.481,18.136 49.657,18.311 v1(49.657,19.964)
SEG6: D27_1.1 D62_1.1 D70.1 D80.1 D86.1 D87.2 D88.2 D89.2 D90.2 D91.2 D92.2 D93.2 D97.1 D102.1 D102_1.1 D102_2.1 U1.13 | length 147.9
  TopLayer w0.3: D70.1 -35.202,22.504 -32.594,22.504 -30.837,20.747 -27.091,20.747 -26.48,20.136 -23.565,20.136 -23.266,19.837 -23.266,18.21 -23.091,18.034 -22.386,18.034 D86.1 -21.664,18.054 -21.488,18.229 -21.488,19.226 -21.313,19.401 D88.2 -20.597,19.417 -19.6,19.417 -19.434,19.583 v1(-19.38,19.583) ; v1(-19.456,21.092) -19.431,21.117 -19.431,21.867 ; v1@-19.361,19.431 -18.329,19.431 -18.315,19.417 -18.186,19.417 ; D90.2 -18.332,21.692 -19.255,21.692 -19.431,21.867 ; D91.2 -18.315,19.289 -18.186,19.417 ; D92.2 -15.879,24.079 -15.879,25.626 -16.055,25.802 D89.2 -20.07,25.802 -20.614,25.259 D87.2 -19.607,23.973 -19.431,23.798 -19.431,21.867 ; D97.1 -14.734,17.933 -14.91,18.109 -14.91,19.228 -15.116,19.434 D93.2 -16.045,19.417 -18.186,19.417 ; v1(-7.518,16.129) -7.493,16.154 2.845,16.154 v1(2.87,16.18) 11.61,16.18 11.786,16.356 11.786,17.752 D102.1 14.313,17.899 14.984,18.57 17.549,18.57 18.22,17.899 19.044,17.899 D102_1.1 22.055,17.925 22.809,17.17 25.403,17.17 26.157,17.925 D102_2.1 ; v1(48.362,19.66) 49.576,18.445 63.251,18.445 64.487,19.681 64.487,20.681 64.311,20.857 62.462,20.857 61.784,20.179 D62_1.1 60.517,20.179 60.122,20.574 60.122,23.851 60.452,24.18 D27_1.1
  BottomLayer w0.3: v1(-19.456,21.092) -19.418,21.054 -19.418,19.621 v1(-19.38,19.583) ; v1(-14.682,17.877) -12.559,17.877 -10.312,20.125 -8.244,20.125 -7.518,19.399 v1(-7.518,16.129) ; U1.13 2.614,16.49 2.87,16.234 v1(2.87,16.18) ; v1(25.699,17.455) 25.699,18.815 26.543,19.66 v1(48.362,19.66)
SEG7: D73.1 D77.2 D78.2 D79.2 D80.2 D81.2 D82.2 D84.1 D85.2 D90.1 D96.1 D101.1 D101_1.1 D101_2.1 D127.1 U1.12 | length 154.3
  TopLayer w0.3: D73.1 -32.952,20.269 -28.892,20.269 -28.716,20.094 D78.2 -28.538,19.224 -26.234,19.224 ; D77.2 -28.716,24.878 -27.788,25.806 v1(-27.305,25.806) -27.303,25.804 -26.432,25.804 D79.2 -24.345,25.802 -24.17,25.626 D82.2 D82.2@-24.199,23.978 ; v1@-27.343,21.577 v1(-27.305,21.615) ; v1@-27.294,21.626 -26.441,21.626 D80.2 -22.339,21.637 ; D81.2 -26.38,17.597 -26.38,19.077 -26.234,19.224 ; D85.2 -24.322,19.224 -26.234,19.224 ; D84.1 -22.339,22.243 -22.339,21.627 -21.082,20.371 -18.511,20.371 -18.339,20.199 -11.727,20.199 D96.1 ; v1(-7.722,21.107) -7.722,22.938 -7.546,23.114 -5.965,23.114 -3.45,20.599 3.05,20.599 3.226,20.424 v1(3.226,19.497) ; v1(4.953,21.107) 5.359,21.514 10.976,21.514 11.882,22.42 D101.1 11.982,22.42 12.182,22.62 12.182,22.67 12.603,23.091 18.352,23.091 18.797,22.646 18.87,22.646 D101_1.1 19.12,22.446 19.813,23.139 24.229,23.139 24.419,22.95 v1(25.571,22.95) ; v1@25.546,22.911 25.692,22.911 26.157,22.446 D101_2.1 ; v1(50.673,26.34) 79.959,26.34 81.534,24.765 81.534,20.98 80.917,20.363 D127.1
  BottomLayer w0.3: v1(-27.408,19.238) -27.408,19.292 -27.305,19.395 -27.305,21.523 v1(-27.305,21.615) v1(-27.305,25.806) ; v1(-12.395,20.132) -11.42,21.107 v1(-7.722,21.107) ; U1.12 3.264,19.497 3.264,20.638 3.734,21.107 v1(4.953,21.107) ; v1(25.571,22.95) 25.626,22.95 26.248,22.327 46.66,22.327 v1(50.673,26.34)
SEG8: D70.2 D71.2 D72.2 D73.2 D74.2 D75.2 D76.2 D77.1 D87.1 D94.1 D108.1 D108_1.1 D108_2.1 U1.11 | length 108
  TopLayer w0.3: D70.2 -35.486,23.721 -36.02,23.721 -36.028,23.712 -36.328,23.712 -36.504,23.888 ; D73.2 -33.182,21.539 -36.301,21.539 -36.504,21.336 ; D74.2 -32.842,17.754 -32.842,19.355 -35.248,19.355 D72.2 -35.396,19.3 -36.328,19.3 -36.504,19.476 -36.504,21.336 ; -32.842,19.329 -30.846,19.329 D76.2 ; D75.2 -30.698,23.948 -30.498,24.148 -30.498,24.925 v1(-29.464,25.959) ; v1@-29.66,25.817 -33.019,25.817 D71.2 -36.328,25.802 -36.504,25.626 -36.504,23.888 ; v1(-29.475,22.367) -29.447,22.395 -28.744,22.395 D77.1 ; v1@-29.451,25.946 -28.651,26.746 -21.488,26.746 ; D87.1 -21.313,22.473 -21.488,22.649 -21.488,26.746 ; v1(-15.189,26.746) -21.488,26.746 ; v1@-14.86,22.404 D94.1 ; v1@-8.179,25.4 -7.087,25.4 -2.997,21.311 3.962,21.311 4.267,21.006 v1(4.267,19.852) 4.303,19.888 5.309,19.888 6.394,20.974 13.455,20.974 D108.1 13.519,21.184 13.519,21.497 13.695,21.673 15.47,21.673 16.256,20.887 20.629,20.887 D108_1.1 20.831,21.084 20.831,21.417 21.026,21.612 23.295,21.612 23.972,20.935 D108_2.1 ; -36.504,21.336 -36.504,23.888
  BottomLayer w0.3: v1(-29.475,22.367) -29.469,22.372 -29.469,25.953 v1(-29.464,25.959) ; v1(-15.189,26.746) -9.688,26.746 v1(-8.306,25.364) ; v1@-15.062,26.565 -15.062,22.694 -14.808,22.44 v1(-14.808,22.418) ; U1.11 3.914,19.586 v1@4.191,19.863
SEG9: D18_1.2 D21_1.2 D27_1.2 D27_2.2 D27_3.2 D126.2 D127.2 U1.9 | length 142.1
  TopLayer w0.3: v1@65.08,16.683 D27_2.2 ; D27_1.2 65.101,24.13 65.301,23.93 65.554,23.93 66.116,23.368 71.503,23.368 71.503,24.156 D21_1.2 73.66,24.18 74.029,23.812 D18_1.2 74.073,21.749 78.087,21.749 D126.2 78.166,21.828 78.979,21.828 ; D27_3.2 71.511,17.562 72.48,17.562 v1(72.511,17.532) ; v1@78.803,17.543 78.979,17.719 78.979,21.828 ; D127.2 79.791,21.828 78.979,21.828
  BottomLayer w0.3: U1.9 3.264,24.932 3.44,25.108 5.118,25.108 6.045,24.181 6.045,7.163 10.846,2.362 36.652,2.362 41.173,6.883 47.65,6.883 49.047,5.486 69.139,5.486 73.33,9.677 73.33,16.713 v1(72.511,17.532) ; v1(65.069,16.693) 72.167,16.693 72.473,16.999 72.473,17.493 v1(72.511,17.532) ; v1(78.898,17.574) 78.877,17.553 72.532,17.553 v1(72.511,17.532)
SEG10: D19_1.2 D22_1.2 D25_1.2 D28_1.2 D60_1.2 D62_1.2 U1.10 | length 129.7
  TopLayer w0.3: D62_1.2 61.418,21.667 70.408,21.667 70.486,21.745 70.929,21.745 v1(70.967,21.783) 71.006,21.745 71.474,21.745 D19_1.2
  BottomLayer w0.3: U1.10 4.949,23.806 5.531,23.224 5.531,6.407 10.363,1.575 36.957,1.575 40.948,5.566 40.948,5.567 41.057,5.677 41.553,6.172 41.585,6.172 47.244,6.172 48.565,4.851 71.069,4.851 80.848,14.63 80.848,21.463 80.442,21.869 75.775,21.869 75.688,21.783 v1(70.967,21.783)
TK1: 
TK2: 
TK3: 
pads on no net: U4.1

## Keep-outs
KeepOutLayer:
  circle w0.013: c-27.866,37.566 r1.15
  circle w0.013: c4.134,37.566 r1.15
  circle w0.013: c44.134,37.566 r1.15
  circle w0.013: c74.904,4.266 r1.15
  circle w0.013: c44.134,4.266 r1.15
  circle w0.013: c4.134,4.266 r1.15
  circle w0.013: c-27.866,4.266 r1.15
  lines w0.013: -43.666,7.211 cw(c-27.866,20.916) -43.666,34.62 ; -43.666,7.211 cw(c-27.866,20.916) -43.666,34.62 ; -43.666,7.211 -43.144,7.733 ; -43.666,7.211 -43.144,7.733 ; -43.666,34.62 -43.144,34.098 ; -43.666,34.62 -43.144,34.098 ; -43.144,7.733 cw(c-42.096,6.685) -41.151,7.827 ; -43.144,7.733 cw(c-42.096,6.685) -41.151,7.827 ; -43.144,34.098 ccw(c-42.096,35.146) -42.096,33.664 ; -43.144,34.098 ccw(c-42.096,35.146) -42.096,33.664 ; -42.096,33.664 ccw(c-42.096,35.146) -41.151,34.005 ; -42.096,33.664 ccw(c-42.096,35.146) -41.151,34.005 ; -41.57,5.115 ccw(c-27.866,20.916) -27.866,0 ; -41.57,5.115 ccw(c-27.866,20.916) -27.866,0 ; -41.57,5.115 -41.048,5.637 ; -41.57,5.115 -41.048,5.637 ; -41.57,36.716 cw(c-27.866,20.916) -27.866,41.831 ; -41.57,36.716 cw(c-27.866,20.916) -27.866,41.831 ; -41.57,36.716 -41.048,36.194 ; -41.57,36.716 -41.048,36.194 ; -41.151,7.827 -40.955,7.63 ; -41.151,7.827 -40.955,7.63 ; -41.151,34.005 -40.955,34.201 ; -41.151,34.005 -40.955,34.201 ; -41.048,5.637 ccw(c-42.096,6.685) -40.955,7.63 ; -41.048,5.637 ccw(c-42.096,6.685) -40.955,7.63 ; -41.048,36.194 cw(c-42.096,35.146) -40.955,34.201 ; -41.048,36.194 cw(c-42.096,35.146) -40.955,34.201 ; -27.866,0 0,0 ; -27.866,0 0,0 ; -27.866,41.831 0,41.831 ; -27.866,41.831 0,41.831 ; 0,0 0,0.791 ; 0,0 0,0.791 ; 0,0.791 cw(c1.482,0.791) 1.338,2.266 ; 0,0.791 cw(c1.482,0.791) 1.338,2.266 ; 0,41.041 ccw(c1.482,41.041) 1.338,39.566 ; 0,41.041 ccw(c1.482,41.041) 1.338,39.566 ; 0,41.041 0,41.831 ; 0,41.041 0,41.831 ; 1.338,2.266 1.626,2.266 ; 1.338,2.266 1.626,2.266 ; 1.338,39.566 1.482,39.559 ; 1.338,39.566 1.482,39.559 ; 1.482,39.559 1.626,39.566 ; 1.482,39.559 1.626,39.566 ; 1.626,2.266 cw(c1.482,0.791) 2.964,0.791 ; 1.626,2.266 cw(c1.482,0.791) 2.964,0.791 ; 1.626,39.566 ccw(c1.482,41.041) 2.964,41.041 ; 1.626,39.566 ccw(c1.482,41.041) 2.964,41.041 ; 2.964,0 44.071,0 ; 2.964,0 2.964,0.791 ; 2.964,0 2.964,0.791 ; 2.964,0 44.071,0 ; 2.964,41.041 2.964,41.831 ; 2.964,41.041 2.964,41.831 ; 2.964,41.831 44.071,41.831 ; 2.964,41.831 44.071,41.831 ; 44.071,0 44.071,0.791 ; 44.071,0 44.071,0.791 ; 44.071,0.791 cw(c45.553,0.791) 45.409,2.266 ; 44.071,0.791 cw(c45.553,0.791) 45.409,2.266 ; 44.071,41.041 ccw(c45.553,41.041) 45.409,39.566 ; 44.071,41.041 ccw(c45.553,41.041) 45.409,39.566 ; 44.071,41.041 44.071,41.831 ; 44.071,41.041 44.071,41.831 ; 45.409,2.266 45.698,2.266 ; 45.409,2.266 45.698,2.266 ; 45.409,39.566 45.553,39.559 ; 45.409,39.566 45.553,39.559 ; 45.553,39.559 45.698,39.566 ; 45.553,39.559 45.698,39.566 ; 45.698,2.266 cw(c45.553,0.791) 47.036,0.791 ; 45.698,2.266 cw(c45.553,0.791) 47.036,0.791 ; 45.698,39.566 ccw(c45.553,41.041) 47.036,41.041 ; 45.698,39.566 ccw(c45.553,41.041) 47.036,41.041 ; 47.036,0 74.901,0 ; 47.036,0 47.036,0.791 ; 47.036,0 47.036,0.791 ; 47.036,0 74.901,0 ; 47.036,41.041 47.036,41.831 ; 47.036,41.041 47.036,41.831 ; 47.036,41.831 74.901,41.831 ; 47.036,41.831 74.901,41.831 ; 74.901,0 ccw(c74.901,20.916) 88.606,5.115 ; 74.901,0 ccw(c74.901,20.916) 88.606,5.115 ; 74.901,41.831 cw(c74.901,20.916) 88.606,36.716 ; 74.901,41.831 cw(c74.901,20.916) 88.606,36.716 ; 87.977,7.614 ccw(c89.132,6.685) 88.084,5.637 ; 87.977,7.614 ccw(c89.132,6.685) 88.084,5.637 ; 87.977,7.614 88.203,7.84 ; 87.977,7.614 88.203,7.84 ; 87.977,34.217 cw(c89.132,35.146) 88.084,36.194 ; 87.977,34.217 cw(c89.132,35.146) 88.084,36.194 ; 87.977,34.217 87.986,34.206 ; 87.977,34.217 87.986,34.206 ; 87.986,34.206 88.203,33.991 ; 87.986,34.206 88.203,33.991 ; 88.084,5.637 88.606,5.115 ; 88.084,5.637 88.606,5.115 ; 88.084,36.194 88.606,36.716 ; 88.084,36.194 88.606,36.716 ; 88.203,7.84 cw(c89.132,6.685) 90.18,7.733 ; 88.203,7.84 cw(c89.132,6.685) 90.18,7.733 ; 88.203,33.991 ccw(c89.132,35.146) 89.132,33.664 ; 88.203,33.991 ccw(c89.132,35.146) 89.132,33.664 ; 89.132,33.664 ccw(c89.132,35.146) 90.18,34.098 ; 89.132,33.664 ccw(c89.132,35.146) 90.18,34.098 ; 90.18,7.733 90.702,7.211 ; 90.18,7.733 90.702,7.211 ; 90.18,34.098 90.702,34.62 ; 90.18,34.098 90.702,34.62 ; 90.702,7.211 ccw(c74.901,20.916) 90.702,34.62 ; 90.702,7.211 ccw(c74.901,20.916) 90.702,34.62 ; 74.336,36.566 cw(c74.904,37.566) 74.904,38.716 cw(c74.904,37.566) 75.472,36.566 cw(c74.904,37.566) 74.336,36.566

## Other copper
TopLayer:
  region net GND_EN: 3.099,11.862 2.54,11.862 1.753,11.633 1.753,8.458 2.362,7.849 4.394,7.849 4.724,8.179 4.724,11.151 4.267,11.608
  region net NTC_ADC: -0.787,11.1 -1.727,10.871 -2.362,10.465 -2.362,9.144 -1.346,8.128 0.254,8.128 0.864,8.738 0.864,10.541 0.533,10.871
  region net B+: 55.575,35.357 54.991,35.357 54.077,34.442 49.555,34.442 47.6,32.487 47.6,24.155 50.47,21.285 57.836,21.285 58.141,21.59 58.141,22.784 57.912,23.012 50.927,23.012 49.555,24.384 49.555,31.877 50.648,32.969 54.534,32.969 54.534,32.309 54.94,31.902 55.982,31.902 56.54,32.461 56.54,34.9
  region net CX2: 70.815,34.696 69.266,34.696 68.021,33.452 68.021,29.739 69.084,28.677 70.714,28.677 71.933,29.896 71.933,33.579
  region net CX1: 64.908,35.082 63.17,34.442 63.17,28.499 66.396,28.499 67.234,29.337 67.234,33.985 66.301,34.918
BottomLayer:
  region net GND_EN: 3.378,11.582 2.972,11.582 2.083,10.693 2.083,8.28 2.54,7.823 4.14,7.823 4.623,8.306 4.623,11.176 4.521,11.278
  region net GND: -1.854,24.587 -1.778,24.511 -1.778,22.936 -1.803,22.936 -2.972,21.768 -2.972,21.26 -3.226,21.006 -5.74,21.006 -6.274,20.472 -6.274,14.834 -5.74,14.3 -3.632,14.3 -3.429,14.503 -2.743,14.503 -2.642,14.402 -2.642,12.751 -2.692,12.7 -2.718,12.725 -4.521,12.725 -5.029,13.233 -6.121,13.233 -6.909,14.021 -6.909,21.031 -6.299,21.641 -4.343,21.641 -3.81,22.174 -3.81,24.587
  region net B+: -3.658,20.752 -3.835,20.752 -3.835,18.212 -2.921,17.297 -1.829,17.297 -1.727,17.399 -1.727,19.583 -2.921,20.752
  region net B+: 9.842,24.244 9.239,23.641 9.322,17.577 10.058,16.713 10.058,15.088 13.208,11.938 13.437,11.938 13.716,12.217 13.456,12.478 13.456,13.069 12.941,13.069 11.405,14.808 11.227,19.609 10.414,20.422 10.414,23.673
  region net GND: 14.148,14.453 14.326,14.63 16.332,14.63 17.399,13.564 19.685,13.564 19.812,13.437 19.812,13.03 19.736,12.954 17.323,12.954 16.332,13.945 14.351,13.945 14.173,14.122
  region net B+: 12.675,12.878 13.411,13.614 16.027,13.614 16.18,13.462 16.18,12.167 15.951,11.938 13.233,11.938 13.208,11.963
  region net B+: 56.159,23.012 56.363,23.216 57.785,23.216 58.09,22.911 58.064,22.885 58.064,18.161 57.709,17.805 56.642,17.805 56.642,20.396 56.083,20.955 56.083,22.479
  region net NTC_ADC: -2.108,14.656 -2.337,14.427 -2.362,14.427 -2.362,9.119 -1.397,8.153 0.279,8.153 0.838,8.712 0.838,10.058 0.178,10.719 -1.245,10.719 -1.245,14.275 -1.626,14.656
  region net B+: 56.617,18.136 56.617,18.161 57.15,18.694 60.427,18.694 64.033,15.088 67.056,15.088 67.843,14.3 67.843,13.005 68.402,12.446 69.342,12.446 69.469,12.319 69.469,11.43 69.291,11.252 65.456,11.252 59.182,17.526 56.921,17.526 56.642,17.805
  region net B-: 53.375,20.076 53.188,19.888 53.188,17.145 53.899,16.434 55.093,16.434 64.516,7.01 67.31,7.01 69.317,9.017 69.317,10.643 69.088,10.871 62.916,10.871 56.54,17.247 54.153,17.247 53.95,17.45 53.95,19.99
  region net B5: 54.737,20.218 54.407,20.117 54.28,20.041 54.28,17.678 54.407,17.551 56.058,17.551 56.337,17.831 56.337,19.761 55.905,20.193
  region net GND: 51.968,26.772 51.74,26.543 51.74,20.371 50.622,19.253 50.622,15.748 51.638,14.732 54.686,14.732 55.016,15.062 55.016,15.9 54.864,16.053 52.07,16.053 51.867,16.358 51.816,16.561 51.816,18.948 53.188,20.32 53.188,26.316 53.139,26.365
  region net 5V: 53.975,30.15 53.975,30.607 54.102,30.734 57.252,30.734 60.35,27.635 72.187,27.635 73.812,29.261 73.812,33.528 74.27,33.985 75.794,33.985 76.073,33.706 76.073,28.016 74.168,26.111 59.969,26.111 57.252,28.829 55.702,28.829 55.245,28.372 55.245,27.127 55.143,27.026 53.95,27.026
  region net CX2: 69.292,34.875 68.021,33.604 68.021,29.892 69.186,28.727 71.12,28.727 72.161,29.769 72.161,33.934 71.244,34.852
  region net CX1: 66.218,34.823 63.068,34.823 63.068,30.099 63.068,28.6 65.989,28.6 67.234,29.845 67.234,33.807
  region net NetR4_1: 52.146,30.582 51.918,30.582 51.918,27.864 51.994,27.788 52.527,27.788 52.654,27.915 52.654,30.455 52.591,30.518
  region net GND: 55.664,27.991 55.855,28.27 55.855,28.321 56.871,28.321 56.998,28.194 56.998,26.543 56.312,25.857 52.451,25.857 51.816,26.492 51.816,27.381 51.994,27.559 52.73,27.559 52.857,27.686 52.857,34.011 52.375,34.493 52.375,35.712 53.365,36.703 60.3,36.703 61.265,35.738 61.265,29.82 61.036,29.591 59.538,29.591 59.131,29.997 59.131,35.052 58.496,35.687 54.051,35.687 53.772,35.408 53.772,31.801 53.569,31.471 53.569,31.344 53.569,26.924 53.95,26.543 55.499,26.543 55.664,26.708 55.728,27
  region net B+: 54.432,35.585 54.254,35.408 54.178,35.408 54.178,33.223 54.051,33.096 54.051,31.979 54.127,31.902 55.093,31.902 56.49,32.448 56.49,34.944 55.448,35.484

## Silkscreen, mask and mechanical layers (free items; w line width, h text height)
TopOverlay:
  drawing of 43499 lines, arcs and shapes, not listed
  text "DL-14542-V01" at -15.042,34.321 h1.52
  text "20261005" at -12.471,32.004 h1.52
BottomOverlay:
  text "B-" at 65.501,5.137 h1.52